# Altium PCB PCB1.PcbDoc
Units mm, origin at the board's own origin, x right, y up, seen from the top; angles counter-clockwise.
Board outline 49.91 x 49.91 mm, 4 copper layers (L1 (Sig), L2 (GND), L3 (GND), L4 (Sig)), stack 1.564 mm thick; 36 components, 59 nets, 255 pads, 135 vias.
Unrouted connection lines stored in the file: 54.
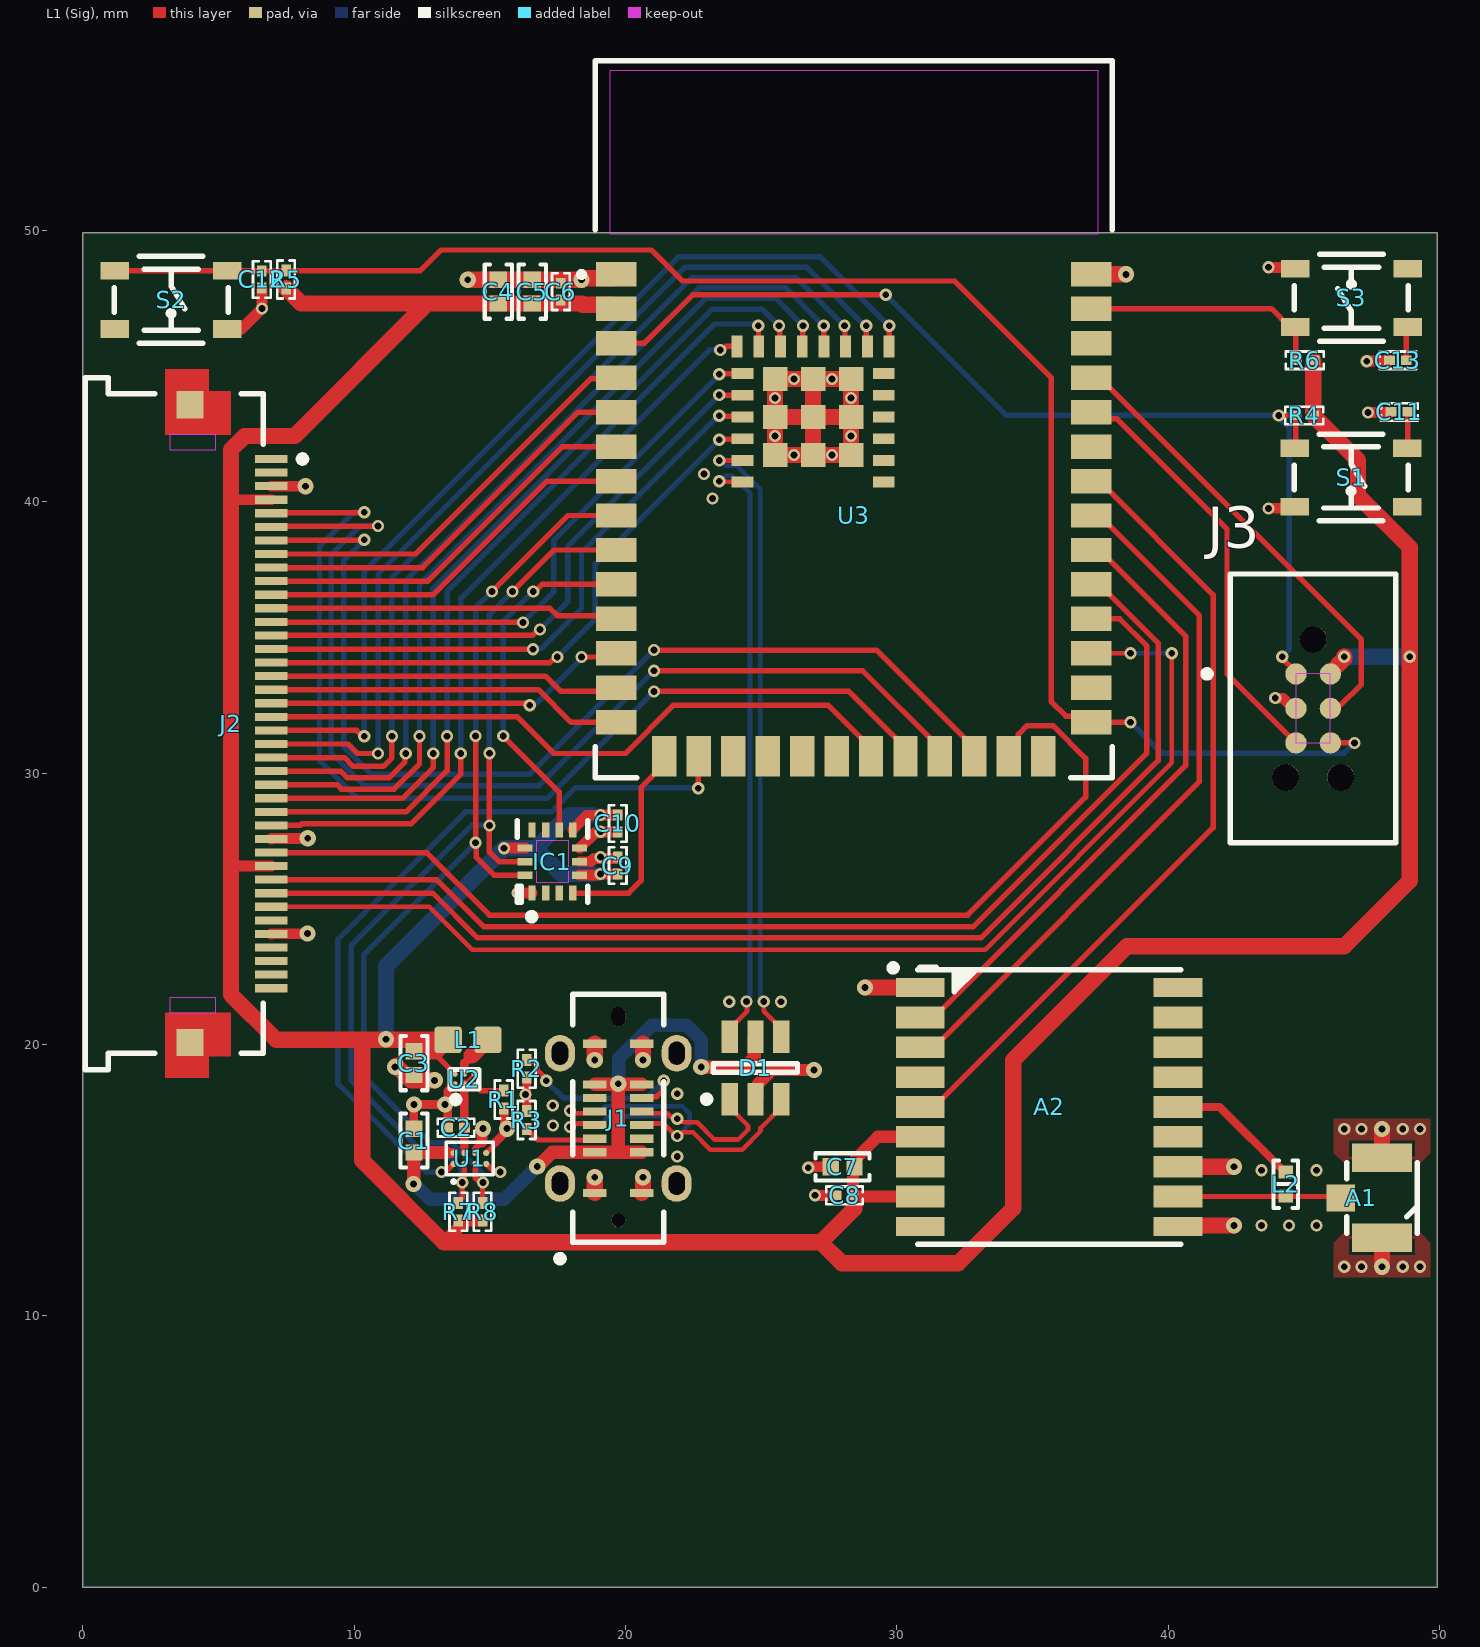
[diagram p0: L1 (Sig) view]
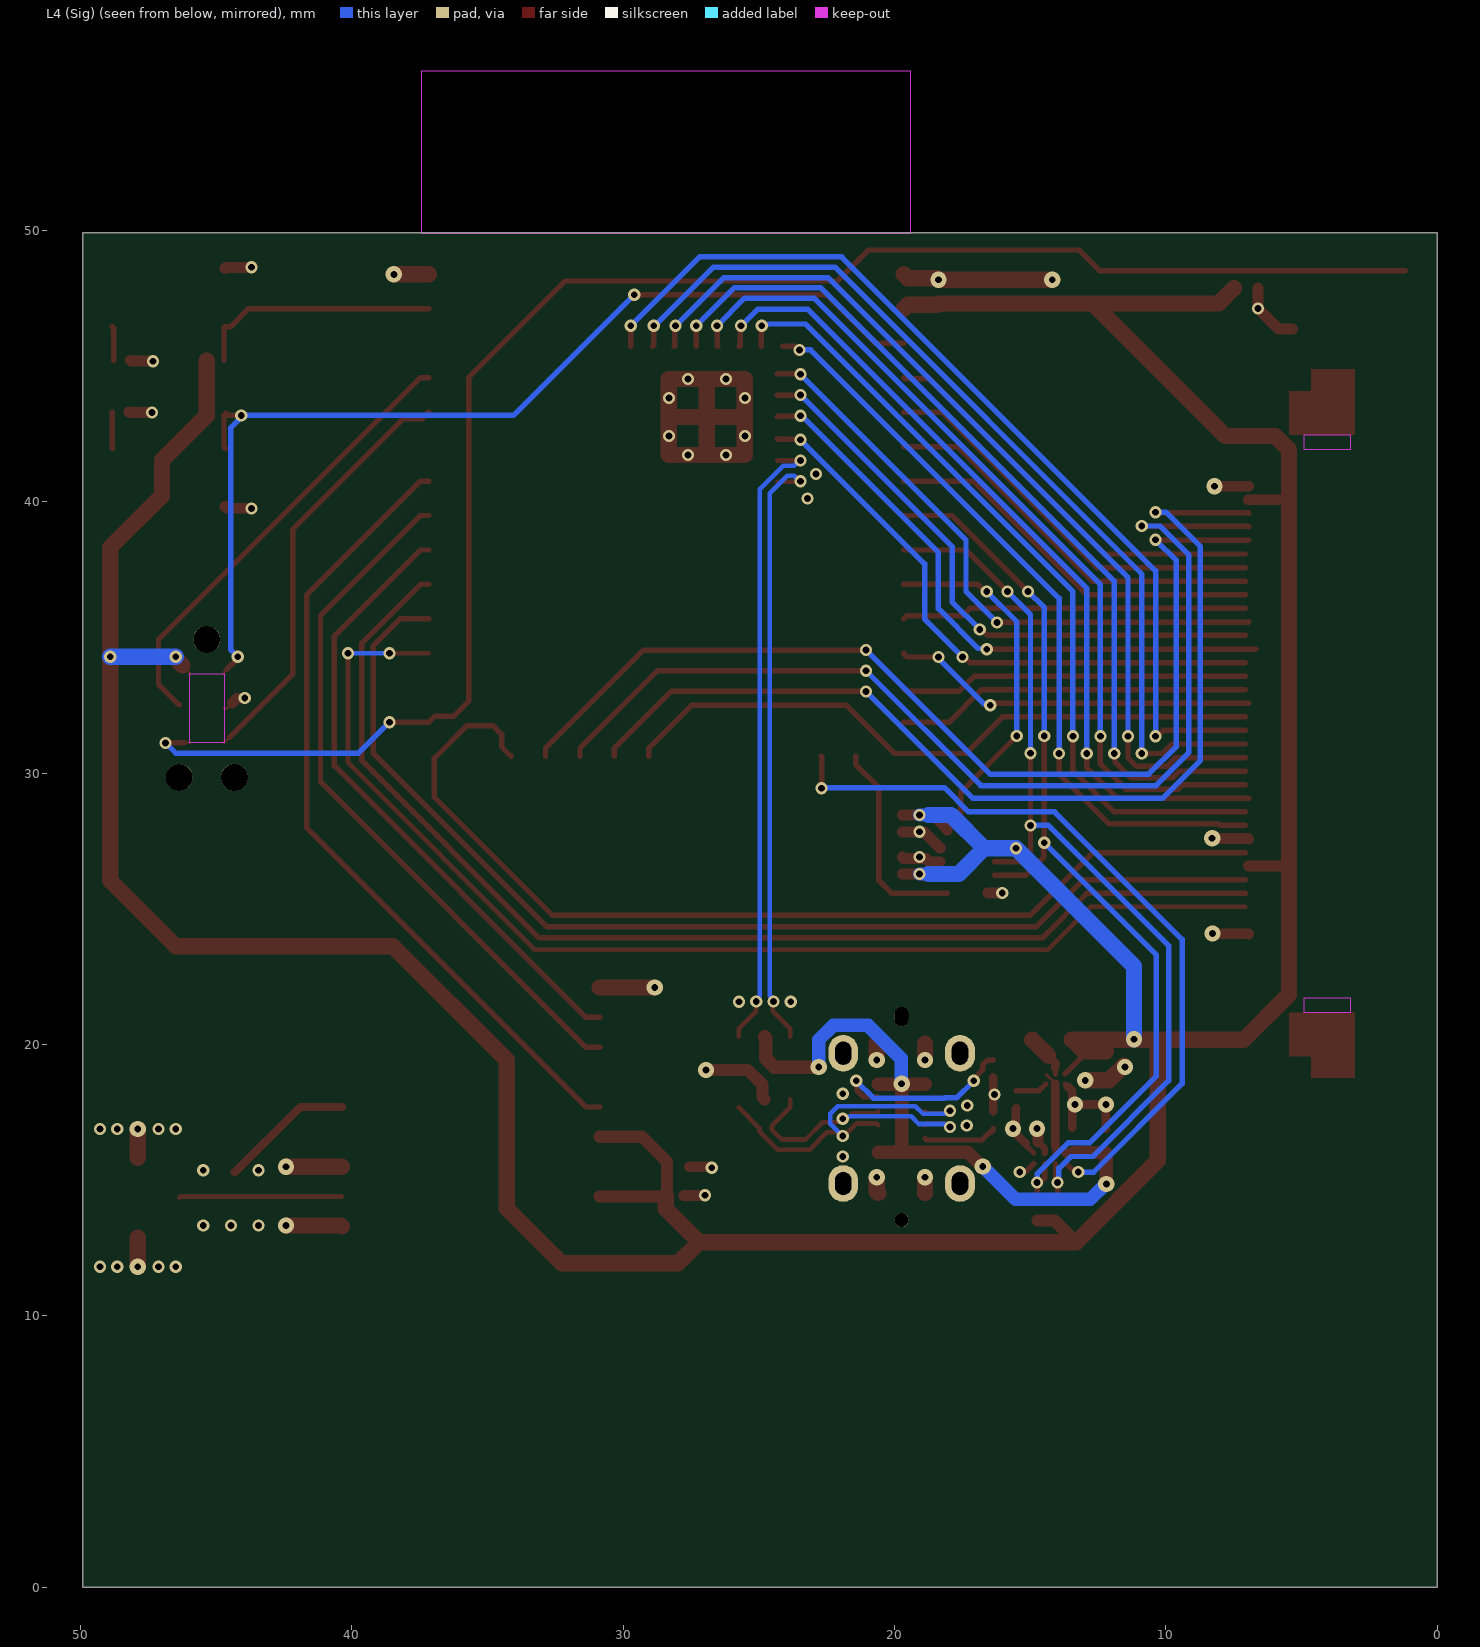
[diagram p1: L4 (Sig) view, seen from below]
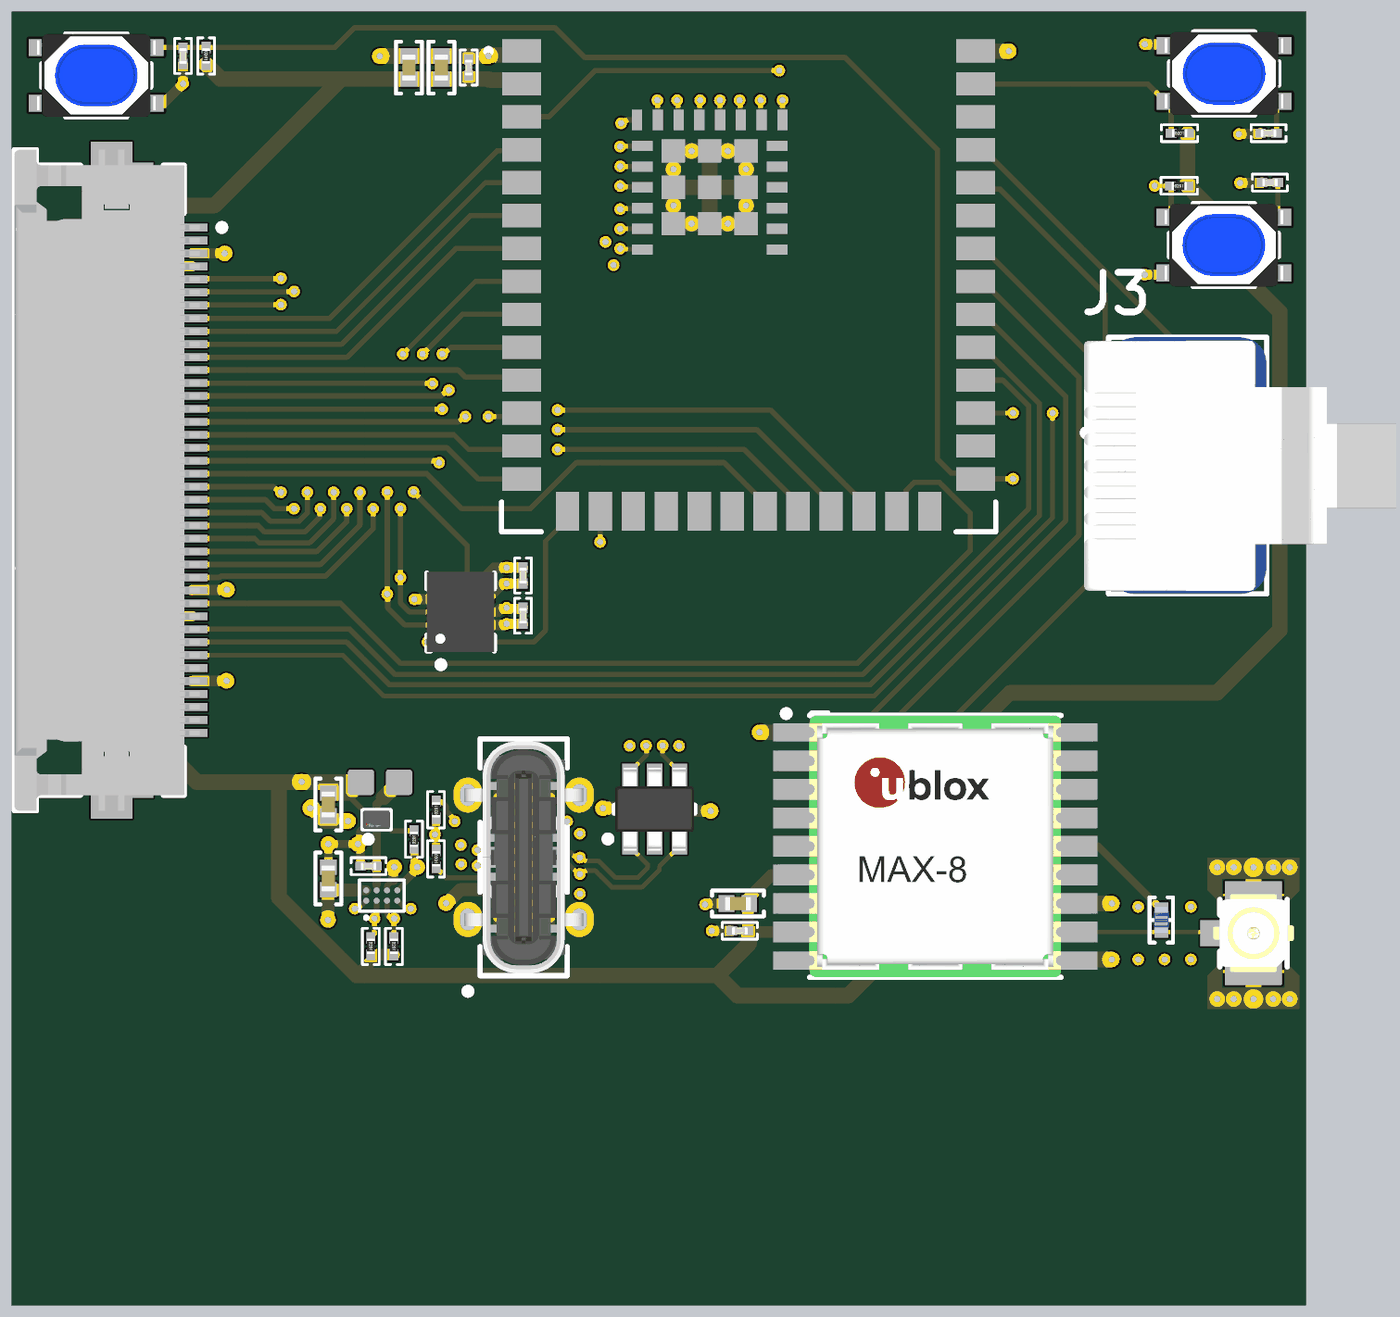
[diagram p2: 3D render of the assembled board from above, using the file's embedded part models]

## Layer stack, top to bottom
Top Solder: solder mask 0.0102, Solder Resist, Dk 3.8
L1 (Sig): signal copper 0.035
Dielectric 1: prepreg 0.0994, PP-015, Dk 4.1
L2 (GND): signal copper 0.0152
Core: core 1.265, Core-011, Dk 4.1
L3 (GND): signal copper 0.0152
Dielectric 2: prepreg 0.0994, PP-015, Dk 4.1
L4 (Sig): signal copper 0.035
Bottom Solder: solder mask 0.0102, Solder Resist, Dk 3.8

## Board outline
0,0 49.911,0 49.911,49.911 0,49.911

## Design rules (kind name [scope] priority, off if disabled: settings)
BoardOutlineClearance [All] p1: gap=0.2 ignorepadtopadclearanceinfootprint=FALSE
Clearance [All] p1: gap=0.102 ignorepadtopadclearanceinfootprint=FALSE except(0.127: Arc-Via Track-Via SMDPad-Via THPad-Via Via-Via Via-Fill Via-Poly Via-Region Via-Text; 0.25: Arc-Hole Track-Hole SMDPad-Hole THPad-Hole Via-Hole Fill-Hole Poly-Hole Region-Hole Text-Hole)
ComponentClearance [All] p1: gap=0.102 collisioncheckmode=3 verticalgap=0.102 showdistances=TRUE
DiffPairsRouting DiffPairsRouting_USB [InDifferentialPairClass('All Differential Pairs')] p1: maxlimit=0.2 minlimit=0.2 mostfreqgap=0.2 toplayer_minwidth=0.173 toplayer_maxwidth=0.173 toplayer_prefwidth=0.173 midlayer1_minwidth=0.137 midlayer1_maxwidth=0.137 midlayer1_prefwidth=0.137 midlayer2_minwidth=0.137 midlayer2_maxwidth=0.137 midlayer2_prefwidth=0.137 bottomlayer_minwidth=0.173 bottomlayer_maxwidth=0.173 bottomlayer_prefwidth=0.173 impedanceprofiledriven=TRUE impedanceprofileid={D67FAF45-6B27-4510-B377-CCE7B71501E8} impedanceprofilevalue=90.000000 maxuncoupledlength=12.7
Height [All] p1: minheight=0 maxheight=1816.048 prefheight=12.7
HoleSize [All] p1: absolutevalues=TRUE maxlimit=6.3 minlimit=0.2 maxpercent=80.000 minpercent=20.000
HoleToHoleClearance [All] p1: gap=0.25 allowstackedmicrovias=FALSE
MinimumAnnularRing [All] p1: minimumring=0.076
MinimumSolderMaskSliver [All] p1: minsoldermaskwidth=0
PlaneClearance [All] p1: clearance=0.102
PlaneConnect PlaneConnectPowerPads [InPadClass('PowerPads')] p1: planeconnectstyle=Direct reliefexpansion=0.508 reliefentries=4 reliefconductorwidth=0.254 reliefairgap=0.254
PlaneConnect [All] p2: pad.planeconnectstyle=Relief pad.reliefexpansion=0.3 pad.reliefentries=4 pad.reliefconductorwidth=0.102 pad.reliefairgap=0.102 via.planeconnectstyle=Direct via.reliefexpansion=0.3 via.reliefentries=4 via.reliefconductorwidth=0.127 via.reliefairgap=0.127
PolygonConnect PolygonConnectPowerPads [All vs (InPadClass('PowerPads'))] p1: connectstyle=Direct reliefconductorwidth=0.254 reliefentries=4 polygonreliefangle="90 Angle" airgapwidth=0.254
PolygonConnect [All] p2: thpad.connectstyle=Relief thpad.reliefconductorwidth=0.102 thpad.reliefentries=4 thpad.polygonreliefangle="90 Angle" thpad.airgapwidth=0.102 smdpad.connectstyle=Relief smdpad.reliefconductorwidth=0.102 smdpad.reliefentries=4 smdpad.polygonreliefangle="90 Angle" smdpad.airgapwidth=0.102 via.connectstyle=Direct via.reliefconductorwidth=0.127 via.reliefentries=4 via.polygonreliefangle="90 Angle" via.airgapwidth=0.127
RoutingVias [All] p1: holewidth=0.2 width=0.45 viastyle="Through Hole" minholewidth=0.2 minwidth=0.45 maxholewidth=6.3 maxwidth=6.55
SilkToSilkClearance [All] p1: silktosilkclearance=0
SilkToSolderMaskClearance [IsPad] p1: minsilkscreentomaskgap=0.102 clearancetoexposedcopper=TRUE
SolderMaskExpansion [All] p1: expansion=0.075 istentingtop=FALSE
SupplyNets "Schematic Supply Nets_2" [InNet('+3V3')] p1: voltage=0.000
SupplyNets "Schematic Supply Nets_1" [InNet('VUSB')] p2: voltage=0.000
SupplyNets "Schematic Supply Nets" [InNet('GND')] p3: voltage=0.000
UnRoutedNet [All] p1: checkbadconnections=TRUE
Width [All] p1: maxlimit=1816.048 minlimit=0.102 preferedwidth=0.102
Width Width_RF [InNetClass('RF')] p2: maxlimit=0.17 minlimit=0.139 preferedwidth=0.17 toplayer_minwidth=0.17 midlayer1_maxwidth=0.139 midlayer1_prefwidth=0.139 midlayer2_maxwidth=0.139 midlayer2_prefwidth=0.139 bottomlayer_minwidth=0.17 impedanceprofiledriven=TRUE impedanceprofileid={17CA45D9-92C9-4379-BA58-7E03AC1924B7} impedanceprofilevalue=50.000000 minimp=50.000000 maximp=50.000000 favimp=50.000000
19 further rules are at their usual default settings.

## Classes and differential pairs
net class RF: ANT_GNSS
differential pair USBD: +USBD_P -USBD_N
differential pair USB_D: +USB_D_P -USB_D_N

## Components (designator, comment, footprint, x,y, rotation, side; value= is the part's Value field where it differs from the comment)
A1 "1909763-1" "TE C-1909763" 47.879,14.351 r270 top
A2 "ATGM336H-5N" "U-BLOX MAX-8Q" 35.611,17.698 r0 top
C1 "10 µF" "CAP 0402_1005" 12.206,16.461 r270 top
C2 "1 µF" "CAP 0201_0603" 13.757,16.937 r0 top
C3 "10 µF" "CAP 0402_1005" 12.206,19.314 r90 top
C4 "10 µF" "CAP 0402_1005" 15.314,47.742 r270 top
C5 "10 µF" "CAP 0402_1005" 16.565,47.742 r270 top
C6 "0.1 µF" "CAP 0201_0603" 17.617,47.742 r270 top
C7 "10 µF" "CAP 0402_1005" 27.999,15.494 r0 top
C8 "0.1 µF" "CAP 0201_0603" 28.073,14.442 r0 top
C9 "0.1 µF" "CAP 0201_0603" 19.714,26.595 r270 top
C10 "0.1 µF" "CAP 0201_0603" 19.714,28.146 r90 top
C11 "1 µF" "CAP 0201_0603" 48.514,43.307 r0 top
C12 "1 µF" "CAP 0201_0603" 6.604,48.189 r90 top
C13 "1 µF" "CAP 0201_0603" 48.458,45.212 r0 top
D1 "USBLC6-2SC6" STM-SOT23-6L_V 24.788,19.136 r90 top value=2.5pF
IC1 "LSM6DSV16XTR" "STM LGA-14L 2.5x3.0MM" 17.305,26.741 r90 top
J1 "217182-0001" FP-217182-0001-MFG 19.736,17.279 r90 top
J2 "54104-4031" MOLX-54104-4031 5.449,31.824 r270 top
J3 "TC2030-MCP-NL" FP-TC2030-MCP-NL-MFG 45.339,32.385 r270 top
L1 "0.47uH" INDC1608X95N 14.198,20.174 r180 top
L2 "47 nH" "IND 0402_1005 RF WW" 44.323,14.859 r270 top
R1 "249 kOhms" "RES 0201_0603" 15.508,17.973 r90 top
R2 "5.1 kOhms" "RES 0201_0603" 16.36,19.111 r90 top
R3 "5.1 kOhms" "RES 0201_0603" 16.36,17.218 r270 top
R4 "5.1 kOhms" "RES 0201_0603" 45.014,43.18 r0 top
R5 "5.1 kOhms" "RES 0201_0603" 7.493,48.189 r270 top
R6 "5.1 kOhms" "RES 0201_0603" 45.029,45.212 r0 top
R7 "5.1 kOhms" "RES 0201_0603" 13.843,13.843 r270 top
R8 "5.1 kOhms" "RES 0201_0603" 14.732,13.843 r270 top
S1 "PTS810 SJM 250 SMTR LFS" "C&K PTS810" 46.736,40.894 r180 top
S2 "PTS810 SJM 250 SMTR LFS" "C&K PTS810" 3.259,47.439 r180 top
S3 "PTS810 SJM 250 SMTR LFS" "C&K PTS810" 46.748,47.516 r0 top
U1 "BQ25180YBGR" BGA8C40P2X4_104X159X50M 14.267,15.803 r90 top
U2 "TPS62802YKAR" FP-YKA0006-IPC_B 14.067,18.727 r90 top
U3 "ESP32-S31-WROOM-1" ESP32-S31-WROOM-1 28.412,40.122 r0 top locked

## Footprints (in the part's own frame and the unit in brackets; to place one, negate y for a bottom-side part, rotate by r counter-clockwise, add the part's x,y. Pads: shape width x height; smd on the part's side, far side on the other; paste and mask are expansions set on the pad)
BGA8C40P2X4_104X159X50M [mm] "BGA, 8-Leads, Body 1,04x1,59mmx0,50mm, Pitch 0,40mm"
  round 0.23 smd mask+0: A1(-0.2,0.6) A2(0.2,0.6) B1(-0.2,0.2) B2(0.2,0.2) C1(-0.2,-0.2) C2(0.2,-0.2) D1(-0.2,-0.6) D2(0.2,-0.6)
  silkscreen extent -0.92,-0.87 0.59,0.87, body extent -0.53,-0.8 0.53,0.81, height 0.5
"C&K PTS810" [mm] "T-Switch, 4-leads, body 4.2x3.2mm, C&K PTS810 SJM 250 SMTR LFS"
  rect 1.05x0.65 smd mask+0.1: 1(-2.075,1.075) 2(2.075,1.075) 3(-2.075,-1.075) 4(2.075,-1.075)
  silkscreen extent -2.1,-1.6 2.1,1.6, body extent -2.29,-1.6 2.29,1.6, height 2.7
"CAP 0201_0603" [mm] "Chip Capacitor, 2-Leads, Body 0.60x0.30mm, IPC Medium Density"
  rect 0.4x0.35 smd: 1(-0.31,0) 2(0.31,0)
  silkscreen extent -0.67,-0.33 0.67,0.33, body extent -0.3,-0.15 0.3,0.15, height 0.3
"CAP 0402_1005" [mm] "Chip Capacitor, 2-Leads, Body 1.02x0.51mm, IPC Medium Density"
  rect 0.6x0.64 smd: 1(-0.44,0) 2(0.44,0)
  silkscreen extent -1,-0.5 1,0.5, body extent -0.5,-0.26 0.5,0.26, height 0.52
ESP32-S31-WROOM-1 [mm]
  rect 1.5x0.9 smd mask+0: 1(-8.75,8.26) 2(-8.75,6.99) 3(-8.75,5.72) 4(-8.75,4.45) 5(-8.75,3.18) 6(-8.75,1.91) 7(-8.75,0.64) 8(-8.75,-0.63) 9(-8.75,-1.9) 10(-8.75,-3.17) 11(-8.75,-4.44) 12(-8.75,-5.71) 13(-8.75,-6.98) 14(-8.75,-8.25) 27(8.75,-8.25) 28(8.75,-6.98) 29(8.75,-5.71) 30(8.75,-4.44) 31(8.75,-3.17) 32(8.75,-1.9) 33(8.75,-0.63) 34(8.75,0.64) 35(8.75,1.91) 36(8.75,3.18) 37(8.75,4.45) 38(8.75,5.72) 39(8.75,6.99) 40(8.75,8.26)
  rect 0.9x1.5 smd mask+0: 15(-6.985,-9.5) 16(-5.715,-9.5) 17(-4.445,-9.5) 18(-3.175,-9.5) 19(-1.905,-9.5) 20(-0.635,-9.5) 21(0.635,-9.5) 22(1.905,-9.5) 23(3.175,-9.5) 24(4.445,-9.5) 25(5.715,-9.5) 26(6.985,-9.5)
  rect 0.9x0.9 smd mask+0: 41(-2.9,1.6) 41(-2.9,3) 41(-2.9,4.4) 41(-1.5,1.6) 41(-1.5,3) 41(-1.5,4.4) 41(-0.1,1.6) 41(-0.1,3) 41(-0.1,4.4)
  rect 0.4x0.8 smd mask+0: 42(1.3,5.6) 43(0.5,5.6) 44(-0.3,5.6) 45(-1.1,5.6) 46(-1.9,5.6) 47(-2.7,5.6) 48(-3.5,5.6) 49(-4.3,5.6)
  rect 0.8x0.4 smd mask+0: 50(-4.1,4.6) 51(-4.1,3.8) 52(-4.1,3) 53(-4.1,2.2) 54(-4.1,1.4) 55(-4.1,0.6) 56(1.1,0.6) 57(1.1,1.4) 58(1.1,2.2) 59(1.1,3) 60(1.1,3.8) 61(1.1,4.6)
  L1 (Sig) keep-out region: -9,9.75 9,9.75 9,15.75 -9,15.75
  L4 (Sig) keep-out region: -9,9.75 9,9.75 9,15.75 -9,15.75
  silkscreen extent -10.13,-10.29 9.53,16.13
FP-217182-0001-MFG [mm]
  rect 0.3x0.87 smd paste+0 mask+0: A1(-2.75,0.865) A4(-1.25,0.865) A5(-0.75,0.865) A6(-0.25,0.865) A7(0.25,0.865) A8(0.75,0.865) A9(1.25,0.865) A12(2.75,0.865) B1(2.75,-0.865) B4(1.25,-0.865) B5(0.75,-0.865) B6(0.25,-0.865) B7(-0.25,-0.865) B8(-0.75,-0.865) B9(-1.25,-0.865) B12(-2.75,-0.865)
  rrect100% 1.35x1.1 hole 0.6 slot 0.85 at 0 deg paste-2539.97 mask+0: S1(-2.4,2.15) S2(2.4,2.15) S3(-2.4,-2.15) S4(2.4,-2.15)
  round 0.52 hole 0.52 unplated paste-2539.97 mask+0: ""(-3.75,0)
  rrect100% 0.72x0.52 hole 0.52 slot 0.72 at 0 deg unplated paste-2539.97 mask+0: ""(3.75,0)
  silkscreen extent -5.29,-1.68 4.57,2.27, body extent -4.67,-2.8 4.67,2.8, height 0.25
FP-TC2030-MCP-NL-MFG [mil]
  round 30.98 smd paste-39370.1 mask+0: 1(-50,-25) 2(-50,25) 3(0,-25) 4(0,25) 5(50,-25) 6(50,25)
  round 39.02 hole 39.02 unplated paste-99999 mask+0: ""(-100,0) ""(100,40) ""(100,-40)
  Keep-Out Layer region: -49.99,-25 50.01,-25 50.01,25 -49.99,25
  silkscreen extent -195,-159 195,120, body extent -199,-124 199,124, height 10
FP-YKA0006-IPC_B [mm]
  round 0.183 smd paste+0 mask+0: A1(-0.175,0.35) A2(0.175,0.35) B1(-0.175,0) B2(0.175,0) C1(-0.175,-0.35) C2(0.175,-0.35)
  silkscreen extent -0.88,-0.53 0.35,0.53, body extent -0.6,-0.78 0.6,0.78, height 0.25
"IND 0402_1005 RF WW" [mm] "Chip Inductor, 2-Leads, Body 1.00x0.50mm, IPC High Density"
  rect 0.48x0.54 smd: 1(-0.44,0) 2(0.44,0)
  silkscreen extent -0.88,-0.45 0.87,0.45, body extent -0.5,-0.29 0.5,0.29, height 0.51
INDC1608X95N [mm] "Chip Inductor, 2-Leads, Body 1,60x0,80mm, IPC Medium Density"
  rrect25% 1.01x0.98 smd: 1(-0.735,0) 2(0.735,0)
  body extent -0.87,-0.48 0.88,0.47, height 0.95
MOLX-54104-4031 [mm] "FPC Connector, 40-Leads, Right Angle, Pitch 0.5 mm, Mated Height 2.0 mm, SMT"
  rect 0.3x1.2 smd: 1(-9.75,1.5) 2(-9.25,1.5) 3(-8.75,1.5) 4(-8.25,1.5) 5(-7.75,1.5) 6(-7.25,1.5) 7(-6.75,1.5) 8(-6.25,1.5) 9(-5.75,1.5) 10(-5.25,1.5) 11(-4.75,1.5) 12(-4.25,1.5) 13(-3.75,1.5) 14(-3.25,1.5) 15(-2.75,1.5) 16(-2.25,1.5) 17(-1.75,1.5) 18(-1.25,1.5) 19(-0.75,1.5) 20(-0.25,1.5) 21(0.25,1.5) 22(0.75,1.5) 23(1.25,1.5) 24(1.75,1.5) 25(2.25,1.5) 26(2.75,1.5) 27(3.25,1.5) 28(3.75,1.5) 29(4.25,1.5) 30(4.75,1.5) 31(5.25,1.5) 32(5.75,1.5) 33(6.25,1.5) 34(6.75,1.5) 35(7.25,1.5) 36(7.75,1.5) 37(8.25,1.5) 38(8.75,1.5) 39(9.25,1.5) 40(9.75,1.5)
  rect 1x1 smd: MP1(-11.75,-1.5) MP2(11.75,-1.5)
  L1 (Sig) region: -10.65,0 -12.25,0 -12.25,-0.8 -13.05,-0.8 -13.05,-2.4 -10.65,-2.4
  L1 (Sig) region: 10.65,0 12.25,0 12.25,-0.8 13.05,-0.8 13.05,-2.4 10.65,-2.4
  Keep-Out Layer region: 10.65,-0.55 10.1,-0.55 10.1,-2.25 10.65,-2.25
  Keep-Out Layer region: -10.1,-0.55 -10.65,-0.55 -10.65,-2.25 -10.1,-2.25
  silkscreen extent -12.75,-5.35 12.75,2.78, body extent -12.75,-5.35 12.75,1.8, height 2.06
"RES 0201_0603" [mm] "Chip Resistor, 2-Leads, Body 0.60x0.30mm, IPC Medium Density"
  rect 0.44x0.35 smd: 1(-0.325,0) 2(0.325,0)
  silkscreen extent -0.7,-0.32 0.7,0.32, body extent -0.3,-0.15 0.3,0.15, height 0.21
"STM LGA-14L 2.5x3.0MM" [mm] "LGA, 14-Leads, Body 3.00x2.50mm, Pitch 0.50mm"
  rect 0.55x0.275 smd: 1(-1.162,0.75) 2(-1.162,0.25) 3(-1.162,-0.25) 4(-1.162,-0.75) 8(1.162,-0.75) 9(1.162,-0.25) 10(1.162,0.25) 11(1.162,0.75)
  rect 0.275x0.55 smd: 5(-0.5,-1) 6(0,-1) 7(0.5,-1) 12(0.5,1) 13(0,1) 14(-0.5,1)
  L1 (Sig) keep-out region: -0.762,-0.6 0.762,-0.6 0.762,0.6 -0.762,0.6
  silkscreen extent -2.16,-1.3 1.5,1.3, body extent -1.55,-1.3 1.55,1.3, height 0.86
STM-SOT23-6L_V [mm] "SOT23, 6-Leads, Body 3.05x1.75mm, Pitch 0.95mm"
  rect 1.2x0.6 smd: 1(-1.15,0.95) 2(-1.15,0) 3(-1.15,-0.95) 4(1.15,-0.95) 5(1.15,0) 6(1.15,0.95)
  silkscreen extent -1.27,-1.55 0.15,1.92, body extent -1.6,-1.53 1.6,1.53, height 1.45
"TE C-1909763" [mm]
  rect 1.05x2.2 smd: G(-1.475,0) G(1.475,0)
  rect 1x1.05 smd: S(0,-1.525)
  silkscreen extent -1.3,-1.3 1.3,1.3, body extent -1.5,-1.55 1.5,1.55, height 1.23
"U-BLOX MAX-8Q" [mm] "MAX-8 / MAX-M8, 18-SMD Module, Body 10.7x9.8mm"
  rect 1.8x0.7 smd paste-10 mask+0: 1(-4.75,4.4) 9(-4.75,-4.4) 10(4.75,-4.4) 18(4.75,4.4)
  rect 1.8x0.8 smd paste-10 mask+0: 2(-4.75,3.3) 3(-4.75,2.2) 4(-4.75,1.1) 5(-4.75,0) 6(-4.75,-1.1) 7(-4.75,-2.2) 8(-4.75,-3.3) 11(4.75,-3.3) 12(4.75,-2.2) 13(4.75,-1.1) 14(4.75,0) 15(4.75,1.1) 16(4.75,2.2) 17(4.75,3.3)
  silkscreen extent -5.87,-5.05 4.85,5.25, body extent -4.85,-5.05 4.85,5.05, height 2.7

## Part data
A1: "CONN UMCC JACK STR 50OHM SMD", Frequency - Max="6 GHz", Housing Color=Ivory, Manufacturer="TE Connectivity AMP Connectors", Supplier Part Number 1=A118077CT-ND, ComponentLink1Description=Datasheet, ComponentLink1URL=https://www.te.com/commerce/DocumentDelivery/DDEController?Action=srchrtrv&DocNm=1909763&DocType=Customer+Drawing&DocLang=English, ComponentLink2Description="DigiKey Link", ComponentLink2URL=https://www.digikey.com/en/products/detail/te-connectivity-amp-connectors/1909763-1/4731728, Connector Style="U.FL (UMCC)", Connector Type="Jack, Male Pin", Contact Termination=Solder, Fastening Type=Snap-On, id=12, Impedance=50Ohm, LastUpdated=2022-06-29T18:17:07.053, Lifecycle Status=Active, Minimum Order=1, Mounting Type="Surface Mount", Number Of Ports=1, Packaging=TapeAndReel, Part Number=1909763-1, Part Status=Active, Price=0.23, Series=-, Shield Termination=Solder, Supplier 1=DigiKey
A2: "RF RX GLONASS/GNSS/GPS 1.575GHZ", Voltage - Supply="2.7V ~ 3.6V", ComponentLink1Description=Datasheet, ComponentLink1URL=https://github.com/YahboomTechnology/GPS_Module/blob/main/1.GPS%20module%20information/ATGM336H-5N%20Datasheet_EN.pdf, Data Interface="I²C, UART", id=1, Part Number=ATGM336H-5N, Series=ATGM336H-5N
C1 C3 C4 C5 C7: library part CL05A106MP5NUNC, "CAP CER 10UF 10V X5R 0402", Device Package="0402 (1005 Metric)", Manufacturer="Samsung Electro-Mechanics", Operating Temperature="-55°C ~ 85°C", Supplier Part Number 1=1276-1450-1-ND, Temperature Coefficient=X5R, Tolerance=±20%, Voltage - Rated=10V, Applications="General Purpose", Capacitance="10 µF", ComponentLink1Description=Datasheet, ComponentLink1URL=http://www.samsungsem.com/kr/support/product-search/mlcc/CL05A106MP5NUNC.jsp, ComponentLink2Description="DigiKey Link", ComponentLink2URL=https://www.digikey.com/en/products/detail/samsung-electro-mechanics/CL05A106MP5NUNC/3887108, id=35, LastUpdated=2023-01-03T20:04:20.307, Lifecycle Status=Active, Minimum Order=1, Mounting Type="Surface Mount, MLCC", Package / Case="0402 (1005 Metric)", Packaging=TapeAndReel, Part Number=CL05A106MP5NUNC, Part Status=Active, PartId=1762, Price=0.02, Series=CL, Size / Dimension="0.039\" L x 0.020\" W (1.00mm x 0.50mm)", Supplier 1=DigiKey, Thickness (Max)="0.028\" (0.70mm)"
C2 C11 C12 C13: library part CL03A105MP3NSNC, "CAP CER 1UF 10V X5R 0201", Device Package="0201 (0603 Metric)", Manufacturer="Samsung Electro-Mechanics", Operating Temperature="-55°C ~ 85°C", Supplier Part Number 1=1276-1324-1-ND, Temperature Coefficient=X5R, Tolerance=±20%, Voltage - Rated=10V, Applications="General Purpose", Capacitance="1 µF", ComponentLink1Description=Datasheet, ComponentLink1URL=http://www.samsungsem.com/kr/support/product-search/mlcc/CL03A105MP3NSNC.jsp, ComponentLink2Description="DigiKey Link", ComponentLink2URL=https://www.digikey.com/en/products/detail/samsung-electro-mechanics/CL03A105MP3NSNC/3886982, id=1118, LastUpdated=2023-01-03T20:01:05.547, Lifecycle Status=Active, Minimum Order=1, Mounting Type="Surface Mount, MLCC", Package / Case="0201 (0603 Metric)", Packaging=TapeAndReel, Part Number=CL03A105MP3NSNC, Part Status=Active, PartId=1341, Price=0.05, Series=CL, Size / Dimension="0.024\" L x 0.012\" W (0.60mm x 0.30mm)", Supplier 1=DigiKey, Thickness (Max)="0.013\" (0.33mm)"
C6 C8 C9 C10: library part CL03A104KO3NNNC, "CAP CER 0.1UF 16V X5R 0201", Device Package="0201 (0603 Metric)", Manufacturer="Samsung Electro-Mechanics", Operating Temperature="-55°C ~ 85°C", Supplier Part Number 1=1276-1319-1-ND, Temperature Coefficient=X5R, Tolerance=±10%, Voltage - Rated=16V, Applications="General Purpose", Capacitance="0.1 µF", ComponentLink1Description=Datasheet, ComponentLink1URL=http://www.samsungsem.com/kr/support/product-search/mlcc/CL03A104KO3NNNC.jsp, ComponentLink2Description="DigiKey Link", ComponentLink2URL=https://www.digikey.com/en/products/detail/samsung-electro-mechanics/CL03A104KO3NNNC/3886977, id=937, LastUpdated=2023-01-03T20:01:08.207, Lifecycle Status=Active, Minimum Order=1, Mounting Type="Surface Mount, MLCC", Package / Case="0201 (0603 Metric)", Packaging=TapeAndReel, Part Number=CL03A104KO3NNNC, Part Status=Active, PartId=1101, Price=0.01, Series=CL, Size / Dimension="0.024\" L x 0.012\" W (0.60mm x 0.30mm)", Supplier 1=DigiKey, Thickness (Max)="0.013\" (0.33mm)"
D1: "STMicroelectronics Uni-directional TVS Diode Array, Vc=17V, SMD, SOT-23, Vbr(min)=6V", Breakdown Voltage=6V, Case/Package=SOT-23, Clamping Voltage=17V, Forward Voltage=1.1V, Leakage Current=150nA, Manufacturer=STMicroelectronics, Max Junction Temperature (Tj)=125°C, Max Repetitive Reverse Voltage (Vrrm)=5.25V, Min Operating Temperature=-40°C, Peak Pulse Current=5A, Peak Pulse Power=85W, Power Line Protection=Yes, Reverse Standoff Voltage=5V, Test Current=1mA, Category="TVS Diodes", China RoHS=Compliant, ComponentLink1Description=https://datasheet.octopart.com:443/USBLC6-2SC6-STMicroelectronics-datasheet-10412581.pdf?src-supplier=Newark, ComponentLink1URL=https://datasheet.octopart.com:443/USBLC6-2SC6-STMicroelectronics-datasheet-10412581.pdf?src-supplier=Newark, ComponentLink2Description=https://datasheet.octopart.com:443/USBLC6-2SC6-STMicroelectronics-datasheet-181961833.pdf?src-supplier=Newark, ComponentLink2URL=https://datasheet.octopart.com:443/USBLC6-2SC6-STMicroelectronics-datasheet-181961833.pdf?src-supplier=Newark, ComponentLink3Description=https://datasheet.octopart.com:443/USBLC6-2SC6-STMicroelectronics-datasheet-525477.pdf?src-supplier=Factory+Futures, ComponentLink3URL=https://datasheet.octopart.com:443/USBLC6-2SC6-STMicroelectronics-datasheet-525477.pdf?src-supplier=Factory+Futures, ComponentLink4Description=https://datasheet.octopart.com:443/USBLC6-2SC6-STMicroelectronics-datasheet-82998616.pdf?src-supplier=Farnell, ComponentLink4URL=https://datasheet.octopart.com:443/USBLC6-2SC6-STMicroelectronics-datasheet-82998616.pdf?src-supplier=Farnell, ComponentLink5Description=https://datasheet.octopart.com:443/USBLC6-2SC6-STMicroelectronics-datasheet-46285.pdf?src-supplier=Farnell, ComponentLink5URL=https://datasheet.octopart.com:443/USBLC6-2SC6-STMicroelectronics-datasheet-46285.pdf?src-supplier=Farnell, ComponentLink6Description=https://datasheet.octopart.com:443/USBLC6-2SC6-STMicroelectronics-datasheet-14050643.pdf?src-supplier=iiiC, ComponentLink6URL=https://datasheet.octopart.com:443/USBLC6-2SC6-STMicroelectronics-datasheet-14050643.pdf?src-supplier=iiiC, ComponentLink7Description=https://datasheet.octopart.com:443/USBLC6-2SC6-STMicroelectronics-datasheet-10521292.pdf?src-supplier=Jameco+(USA), ComponentLink7URL=https://datasheet.octopart.com:443/USBLC6-2SC6-STMicroelectronics-datasheet-10521292.pdf?src-supplier=Jameco+(USA), Contact Plating=Tin, Country of Origin="Mainland China", Data Rate=480Mbps, Depth=1.75mm, Direction=Unidirectional, Element Configuration=Dual, ESD Protection=Yes, Export Control Classification Number (ECCN) Code=EAR99, Harmonized Tariff Schedule (HTS) Code=8541.10.00.50, Height=1.45mm, Introduction Date=2005-03-15, Lead Free="Lead Free", Length=3.05mm, Lifecycle Status=Production, Manufacturer Part Number=USBLC6-2SC6, Max Breakdown Voltage=6V, Max Operating Temperature=125°C, Max Reverse Leakage Current=150nA, Min Breakdown Voltage=6V, Mounting Technology="Surface Mount", Number of Bidirectional Channels=2, Number of Channels=2, Number of Elements=1, Number of Terminals=6, Operating Supply Voltage=1.1V, Peak Reverse Current=150nA, Pins=6, Polarity=Unidirectional, Pricing="3000=0,0806, 6000=0,0793, 12000=0,078, 15000=0,0776, 45000=0,075 (USD)", Radiation Hardening=No, REACH SVHC=Unaffected, Reverse Breakdown Voltage=6V, RoHS=Compliant, Schedule B="8536300000, 8536300000|8536300000|8536300000|8536300000|8536300000|8536300000|8536300000|8536300000|8536300000|8536300000|8536300000|8536300000|8536300000|8536300000|8536300000|8536300000|8536300000|8536300000|8536300000|8536300000|8536300000|8536300000|8536300000|85", Stock=135000, Supplier="Future Electronics", Supplier Part Number=USBLC6-2SC6, Termination=SMD/SMT, Width=1.75mm, Working Voltage=5V
IC1: library part "STM LSM6DSV16X", "INEMO 3D ACCELEROMETER AND 3D GY", Manufacturer=STMicroelectronics, Operating Temperature="-40°C ~ 85°C", Supplier Device Package="14-LGA (2.5x3)", Supplier Part Number 1=497-LSM6DSV16XTRCT-ND, ComponentLink1Description=Datasheet, ComponentLink1URL=https://www.st.com/content/ccc/resource/technical/document/datasheet/group3/47/03/b2/44/47/32/4b/76/DM00741844/files/DM00741844.pdf/jcr:content/translations/en.DM00741844.pdf, ComponentLink2Description="DigiKey Link", ComponentLink2URL=https://www.digikey.com/en/products/detail/stmicroelectronics/LSM6DSV16XTR/16841485, id=1, LastUpdated=2026-02-04T10:16:47.433, Lifecycle Status=Active, Minimum Order=1, Mounting Type="Surface Mount", Output Type="I2C, SPI", Packaging=TapeAndReel, Part Number=LSM6DSV16XTR, Price=2.76, Sensor Type="Accelerometer, Gyroscope, Temperature, 6 Axis", Series=-, Supplier 1=DigiKey
J1: "USB Connector, Receptacle, USB 2.0, USB Type C, 16 Ways, Gold, SMT, Straight, Copper Alloy", Package=Package, Check_prices=https://www.snapeda.com/parts/TYPE-C-31-M-12/HRO+Electronics+Co.%252C+Ltd./view-part/?ref=eda, MF="HRO Electronics Co., Ltd.", MP=TYPE-C-31-M-12, SnapEDA_Link=https://www.snapeda.com/parts/TYPE-C-31-M-12/HRO+Electronics+Co.%252C+Ltd./view-part/?ref=snap
J2: library part CMP-1241-00508-1, "0.5 mm Pitch Easy-On(TM) Type FPC Connector, 2.0 mm Mated Height, Right Angle, ZIF, SMT, Top Contact, 40 Circuits, -20 to 85 degC, ELV and RoHS Compliant, Tape and Reel", Current (Max per Contact)=0.5A, Manufacturer=Molex, Voltage (Max)=50V, Circuits (Loaded)=40, ComponentLink1Description="Manufacturer URL", ComponentLink1URL=http://www.molex.com/molex/index.jsp, ComponentLink2Description=Datasheet, ComponentLink2URL=http://www.molex.com/webdocs/datasheets/pdf/en-us/0541044031_FFC_FPC_CONNECTORS.pdf, ComponentLink3Description="Package Specification", ComponentLink3URL=http://www.molex.com/pdm_docs/sd/541044031_sd.pdf, Contact Position=Top, Durability (mating cycles max)=20, Entry Angle="90degrees Angle", Mated Height=2.00mm, Material - Metal="Phosphor Bronze", Mounting Technology="Surface Mount", Number of Rows=1, Orientation="Right Angle", PackageDescription="40-Lead FPC Connector, Pitch 0.5 mm", PackageReference=54104-4031, PackageVersion="Rev. F, 06/2012", Packing="Tape and Reel", PartNumber=54104-4031, PCB Locator=No, PCB Retention=Yes, Pitch - Mating Interface=0.50mm, Polarized to PCB=Yes, RoHS=TRUE, Stackable=No
J3: library part CMP-205963-000002-1, "CABLE TAG-CONNECT IN-CIRCUIT", Package Quantity=1, Lead Free="Lead Free", Reach SVHC Compliant=Yes, RoHS Compliant=Yes, Series=-
L1: library part LQM18PNR47MFHD, "Inductor Power Chip Shielded Multi-Layer 0.47uH 20% 1MHz Ferrite 1.4A 0.125Ohm DCR 0603 T/R"
L2: library part LQW15AN47NJ00D, "FIXED IND 47NH 210MA 1.08OHM SMD", Current Rating (Amps)="210 mA", DC Resistance (DCR)="1.08Ohm Max", Device Package="0402 (1005 Metric)", Frequency - Self Resonant=2.9GHz, Inductance Frequency - Test="100 MHz", Manufacturer="Murata Electronics", Operating Temperature="-55°C ~ 125°C", Q @ Freq="25 @ 200MHz", Supplier Part Number 1=490-1154-1-ND, Tolerance=±5%, ComponentLink1Description=Datasheet, ComponentLink1URL=https://search.murata.co.jp/Ceramy/image/img/P02/JELF243A-0050.pdf, ComponentLink2Description="DigiKey Link", ComponentLink2URL=https://www.digikey.com/en/products/detail/murata-electronics/LQW15AN47NJ00D/584363, Height - Seated (Max)="0.024\" (0.60mm)", id=266, Inductance="47 nH", LastUpdated=2023-01-02T20:59:31.513, Lifecycle Status=Active, Material - Core=Non-Magnetic, Minimum Order=1, Mounting Type="Surface Mount", Package / Case="0402 (1005 Metric)", Packaging=TapeAndReel, Part Number=LQW15AN47NJ00D, Part Status=Active, PartId=266, Price=0.05, Series=LQW15, Shielding=Unshielded, Size / Dimension="0.039\" L x 0.020\" W (1.00mm x 0.50mm)", Supplier 1=DigiKey, Type=Wirewound
R1: library part RC0201FR-07249KL, "RES 249K OHM 1% 1/20W 0201", Device Package="0201 (0603 Metric)", Manufacturer=Yageo, Operating Temperature="-55°C ~ 125°C", Power (Watts)="0.05W, 1/20W", Supplier Device Package=0201, Supplier Part Number 1=YAG2335CT-ND, Temperature Coefficient=±200ppm/°C, Tolerance=±1%, ComponentLink1Description=Datasheet, ComponentLink1URL=https://www.yageo.com/upload/media/product/productsearch/datasheet/rchip/PYu-RC_Group_51_RoHS_L_10.pdf, ComponentLink2Description="DigiKey Link", ComponentLink2URL=https://www.digikey.com/en/products/detail/yageo/RC0201FR-07249KL/3202395, Composition="Thick Film", Features="Moisture Resistant", Height - Seated (Max)="0.010\" (0.26mm)", id=1449, LastUpdated=2023-01-03T20:15:18.457, Lifecycle Status=Active, Minimum Order=1, Number Of Terminations=2, Package / Case="0201 (0603 Metric)", Packaging=CutTape, Part Number=RC0201FR-07249KL, Part Status=Active, PartId=1449, Price=0.01, Resistance="249 kOhms", Series=RC_L, Size / Dimension="0.024\" L x 0.012\" W (0.60mm x 0.30mm)", Supplier 1=DigiKey
R2 R3 R4 R5 R6 R7 R8: library part AC0201FR-075K1L, "RES SMD 5.1K OHM 1% 1/20W 0201", Device Package="0201 (0603 Metric)", Manufacturer=Yageo, Operating Temperature="-55°C ~ 155°C", Power (Watts)="0.05W, 1/20W", Ratings=AEC-Q200, Supplier Device Package=0201, Supplier Part Number 1=YAG5228CT-ND, Temperature Coefficient=±200ppm/°C, Tolerance=±1%, ComponentLink1Description=Datasheet, ComponentLink1URL=https://www.yageo.com/upload/media/product/productsearch/datasheet/rchip/PYu-AC_51_RoHS_L_7.pdf, ComponentLink2Description="DigiKey Link", ComponentLink2URL=https://www.digikey.com/en/products/detail/yageo/AC0201FR-075K1L/5894738, Composition="Thick Film", Features="Automotive AEC-Q200, Moisture Resistant", Height - Seated (Max)="0.010\" (0.26mm)", id=225, LastUpdated=2023-01-03T20:15:25.347, Lifecycle Status=Active, Minimum Order=1, Number Of Terminations=2, Package / Case="0201 (0603 Metric)", Packaging=TapeAndReel, Part Number=AC0201FR-075K1L, Part Status=Active, PartId=225, Price=0.01, Resistance="5.1 kOhms", Series=AC, Size / Dimension="0.024\" L x 0.012\" W (0.60mm x 0.30mm)", Supplier 1=DigiKey
S1 S2 S3: "SWITCH TACTILE SPST-NO 0.05A 16V", Contact Rating @ Voltage="0.05A @ 16VDC", Manufacturer=C&K, Operating Force=160gf, Operating Temperature="-40°C ~ 85°C", Supplier Part Number 1=CKN10502CT-ND, Actuator Height Off Pcb, Vertical=2.50mm, Actuator Orientation="Top Actuated", Actuator Type="Oval Button", Circuit=SPST-NO, ComponentLink1Description=Datasheet, ComponentLink1URL=https://dznh3ojzb2azq.cloudfront.net/products/Tactile/PTS810/documents/datasheet.pdf, ComponentLink2Description="DigiKey Link", ComponentLink2URL=http://digikey.com/product-detail/en/c-k/PTS810-SJM-250-SMTR-LFS/CKN10502CT-ND/4176673, id=32, Illumination=Non-Illuminated, LastUpdated=2020-04-09T10:00:13.177, Lifecycle Status=Active, Minimum Order=1, Mounting Type="Surface Mount", Outline="4.20mm x 3.20mm", Packaging=TapeAndReel, Part Number="PTS810 SJM 250 SMTR LFS", Part Status=Active, Price=0.16, Series=PTS810, Supplier 1=DigiKey, Switch Function=Off-Mom, Termination Style="J Lead"
U1: "1-A Li-ion and LiFePO4 I²C programmable linear charger with regulated power path"
U2: library part CMP-04918-000016-1, "IC REG BUCK ADJ/FIX 1A 6DSBGA", Manufacturer="Texas Instruments", Max Junction Temp=+125°C, Max Supply Voltage=5.5V, Min Supply Voltage=1.8V, Nominal Supply Current=8mA, Output Current=1A, Output Voltage=1.8-3.3V, Package=YKA0006, Switching Frequency=4MHz, Temperature="-40°C to +125°C", Temperature Range Low=-40°C, Automotive=No, Category=IC, ComponentLink2Description=Datasheet, ComponentLink2URL=http://www.ti.com/lit/ds/symlink/tps62802.pdf, Device Class L1="Integrated Circuits (ICs)", Device Class L2="Power Management ICs", Device Class L3="Voltage Regulators - Switching", Digikey Description="IC REG BUCK ADJ/FIX 1A 6DSBGA", Height=0.4mm, Ipc Land Pattern Name=BGA6N35P2X3_105X70X40, Lead Free=Yes, Manufacturer Part Number=TPS62802YKAR, Max Duty Cycle=100%, Mouser Description="1.8V-5.5V input, 1-A ultra-low Iq step-down converter 6-DSBGA -40 to 125", Number Of Outputs=1, Octopart=https://octopart.com/tps62802ykar-texas+instruments-93944571, Output Type=AdjustableProgrammable, RoHS=TRUE, Standoff Height=0.13mm, Switching Topology=Buck, Temperature Range High=+125°C

## Via types
v1: diameter 0.45, hole 0.25, L1 (Sig) to L4 (Sig), 108 vias
v2: diameter 0.6, hole 0.25, L1 (Sig) to L4 (Sig), 27 vias

## Nets (pads, with @x,y where several pads share a name; then routed paths per layer and width w, separated by ;. In a path a pad name is that pad's centre, name@x,y a point inside that pad or via, vN(x,y) a via of type N, cw(c..) or ccw(c..) an arc to the next point about the centre after c; other vN are vias at no path point)
+3V3: A2.6 A2.8 C3.2 C4.2 C5.2 C6.2 C7.2 C8.2 C9.2 C10.2 IC1.5 IC1.8 IC1.12 J2.4 J2.31 J3.2 L1.2 R4.2 R5.2 R6.2 R7.2 R8.2 U2.A2 U3.2 | length 163.8
  L1 (Sig) w0.102: J3.2 45.974,33.706 46.233,33.964
  L1 (Sig) w0.2: 13.08,19.554 U2.A2@13.717,18.917
  L1 (Sig) w0.4: 5.461,26.574 J2.31 ; 5.461,40.074 J2.4 ; v1(15.523,27.23) 15.529,27.236 16.299,27.236 IC1.12 ; IC1.8 18.055,27.916 18.586,28.447 19.07,28.447 v1(19.079,28.456) C10.2 ; IC1.5 19.022,26.241 19.066,26.285 v1(19.079,26.285) C9.2
  L1 (Sig) w0.45: 13.304,12.719 14.103,13.518 R8.2 ; C8.2 28.383,15.683 29.298,16.598 A2.6 ; C8.2@28.427,14.398 A2.8
  L1 (Sig) w0.6: R5.2 8.055,47.302 12.689,47.302 ; C3.2 13.028,19.754 L1.2@13.448,20.174 ; L1.2 10.297,20.174 ; U3.2 19.512,47.262 18.419,47.262 18.379,47.302 C4.2 12.689,47.302 ; C8.2@28.427,14.398 28.427,13.949 27.197,12.719 ; R6.2@45.339,45.197 R4.2 46.99,41.529 46.99,40.222 48.895,38.317 v1(48.895,34.29) 48.895,26.035 46.482,23.622 38.481,23.622 34.29,19.431 34.29,13.97 32.258,11.938 27.978,11.938 27.197,12.719 ; 46.233,33.964 46.482,34.214 v1(46.482,34.29) ; 10.297,20.174 10.297,15.726 13.304,12.719 27.197,12.719 ; 10.297,20.174 7.131,20.174 5.461,21.844 5.461,26.574 5.461,40.074 5.461,41.918 5.961,42.418 7.805,42.418 12.689,47.302
  L4 (Sig) w0.49: 18.744,26.285 v1(19.079,26.285) ; 18.744,28.456 v1(19.079,28.456)
  L4 (Sig) w0.6: v2(11.176,20.193) 11.176,22.883 v1(15.523,27.23) 16.688,27.23 ; 18.744,26.285 17.633,26.285 16.688,27.23 ; 18.744,28.456 17.914,28.456 16.688,27.23 ; v1(46.482,34.29) v1(48.895,34.29)
ANT_GNSS: A1.S A2.11 L2.2 | length 6
  L1 (Sig) w0.173: A2.11 46.307,14.398 A1.S
BAT: U1.C2 | length 1
  L1 (Sig) w0.232: U1.C2 14.467,16.169 14.708,16.41
  L1 (Sig) w0.4: 14.708,16.41 14.708,16.863 v2(14.746,16.901)
BQ_INT: U1.A1 U3.16 | length 27.9
  L1 (Sig) w0.2: v1(13.226,15.298) 13.274,15.346 13.402,15.346 13.659,15.603 U1.A1 ; v1(22.685,29.442) 22.685,30.61 U3.16
  L4 (Sig) w0.2: v1(13.226,15.298) 12.657,15.298 9.398,18.557 9.398,23.876 14.097,28.575 17.272,28.575 18.161,29.464 22.663,29.464 v1(22.685,29.442)
DBG_RX0: J3.5 U3.36 | length 15.7
  L1 (Sig) w0.102: J3.5@44.502,31.317 J3.5
  L1 (Sig) w0.2: U3.36 37.406,43.058 38.095,43.058 42.164,38.989 42.164,33.655 J3.5@44.502,31.317
DBG_TX0: J3.4 U3.37 | length 16.7
  L1 (Sig) w0.2: U3.37 37.462,44.572 47.117,34.917 47.117,33.274 46.355,32.512
EN: C11.2 J3.1 R4.1 S1.3 S1.4 U3.3 | length 40.3
  L1 (Sig) w0.102: J3.1@44.593,33.829 44.704,33.718 J3.1
  L1 (Sig) w0.2: U3.3 19.667,45.847 20.701,45.847 22.479,47.625 v1(29.591,47.625) ; v1(44.069,43.18) 44.569,43.18 44.629,43.24 44.629,43.255 44.704,43.18 44.704,42.012 S1.4 ; v1(44.196,34.29) 44.196,34.227 J3.1@44.593,33.829 ; S1.3 48.824,41.982 C11.2
  L4 (Sig) w0.2: v1(29.591,47.625) 34.036,43.18 v1(44.069,43.18) 44.069,43.112 44.45,42.731 44.45,34.544 v1(44.196,34.29)
GND: A1.G A2.1 A2.10 A2.12 C1.1 C2.1 C3.1 C4.1 C5.1 C6.1 C7.1 C8.1 C9.1 C10.1 C11.1 C12.1 C13.1 D1.2 IC1.1 IC1.6 IC1.7 J1.A1 J1.A12 J1.B1 J1.B12 J1.S1 J1.S2 J1.S3 J1.S4 J2.3 J2.29 J2.36 J2.MP1 J2.MP2 J3.3 R1.1 R2.1 R3.1 S1.1 S1.2 S2.1 S2.2 S3.1 S3.2 U1.D2 U2.A1 U3.1 U3.40 U3.41 | length 62
  L1 (Sig) w0.102: J3.3@44.402,32.582 44.599,32.385 J3.3
  L1 (Sig) w0.183: 13.608,18.444 U2.A1
  L1 (Sig) w0.197: U1.D2 15.167,16.303 15.167,16.355
  L1 (Sig) w0.314: C1.1 v2(12.206,17.79) v2(13.349,17.79) ; C2.1 13.447,18.282 13.608,18.444 ; 15.167,16.355 v2@15.635,16.824 ; R1.1 15.526,17.63 15.526,17.088 15.635,16.979 v2(15.635,16.901) ; R3.1 R2.1
  L1 (Sig) w0.358: IC1.6 18.679,26.741 18.698,26.722 18.703,26.722 18.724,26.743
  L1 (Sig) w0.397: J2.3 J2.3@7.35,40.574 ; J2.3@7.351,40.573 v2@8.207,40.573
  L1 (Sig) w0.4: S2.1 5.851,46.364 v1(6.604,47.117) C12.1 ; J2.36 6.956,24.081 8.274,24.081 v2(8.281,24.088) ; J2.29 6.962,27.587 8.282,27.587 v2(8.295,27.601) ; v1(16.031,25.579) IC1.1 ; IC1.7 18.318,27.241 18.913,27.836 C10.1 ; 18.724,26.743 18.841,26.86 19.669,26.86 C9.1 ; v1(26.732,15.458) 26.745,15.458 26.781,15.494 C7.1 ; v1(26.986,14.442) C8.1 ; v1(43.688,39.751) 43.698,39.761 44.603,39.761 S1.2 ; v1(43.688,48.641) 43.698,48.631 44.632,48.631 S3.1 ; v1(43.942,32.766) 43.952,32.756 44.228,32.756 J3.3@44.402,32.582 ; v1(47.315,45.175) 47.325,45.184 48.12,45.184 C13.1 ; v1(47.358,43.29) 48.187,43.29 C11.1
  L1 (Sig) w0.45: D1.2 24.863,18.061 24.863,18.524 25.404,19.065 v2(26.947,19.065)
  L1 (Sig) w0.6: v2@11.553,19.22 12.093,18.679 v2(12.968,18.679) ; v2(14.188,48.182) C5.1 v2(18.379,48.182) 18.429,48.232 19.512,48.232 U3.1 ; J1.A1 v2(18.871,15.108) ; v2(18.871,19.426) J1.A12 ; J1.B12 20.649,14.577 v2(20.649,15.108) ; v2(20.649,19.426) J1.B1@20.649,20.029 ; v2(28.829,22.098) A2.1 ; U3.40 37.167,48.377 v2(38.445,48.377) ; A2.10 40.398,13.335 v2(42.418,13.335) ; A2.12 40.365,15.494 v2(42.418,15.494) ; v2(47.879,11.811) A1.G@47.879,12.876 ; A1.G@47.879,15.826 v2(47.879,16.891) ; U3.41@25.512,43.122 v1(25.512,42.422) 25.512,41.722 v1(26.212,41.722) U3.41@26.912,41.722 ; U3.41@25.512,43.122 v1(25.512,43.822) 25.512,44.522 v1(26.212,44.522) U3.41@26.912,44.522 ; U3.41@25.512,43.122 U3.41@26.912,43.122 ; U3.41@26.912,41.722 U3.41@26.912,43.122 ; U3.41@26.912,41.722 v1(27.612,41.722) 28.312,41.722 v1(28.312,42.422) U3.41@28.312,43.122 ; U3.41@26.912,43.122 U3.41@26.912,44.522 ; U3.41@26.912,43.122 U3.41@28.312,43.122 ; U3.41@26.912,44.522 v1(27.612,44.522) 28.312,44.522 U3.41@28.312,43.122
  other v1: 46.482,11.811 47.117,11.811 48.641,11.811 49.276,11.811 43.434,13.335 44.45,13.335 45.466,13.335 43.434,15.367 45.466,15.367 21.904,15.869 46.482,16.891 47.117,16.891 48.641,16.891 49.276,16.891 17.332,17.012 17.316,17.753 16.316,18.155 21.904,18.189 23.824,21.577 25.729,21.577 19.079,26.905 19.079,27.836 23.205,40.122 22.894,41.019 28.312,43.822
  other v2: 11.505,19.172 8.208,40.572
GNSS_ON: A2.5 U3.34 | length 29.9
  L1 (Sig) w0.2: A2.5 31.361,17.698 41.656,27.993 41.656,36.568 37.462,40.762 U3.34
GNSS_RX: A2.3 U3.33 | length 26
  L1 (Sig) w0.2: A2.3 31.361,19.898 41.148,29.685 41.148,35.806 37.462,39.492 U3.33
GNSS_TX: A2.2 U3.32 | length 23.2
  L1 (Sig) w0.2: A2.2 31.361,20.998 40.64,30.277 40.64,35.044 37.462,38.222 U3.32
GPIO61: C12.2 J3.6 R5.1 S2.3 S2.4 U3.27 | length 61.7
  L1 (Sig) w0.102: J3.6 J3.6@46.176,31.115
  L1 (Sig) w0.2: S2.4 R5.1 12.446,48.514 13.208,49.276 20.955,49.276 22.098,48.133 32.131,48.133 35.687,44.577 35.687,32.639 36.229,32.097 36.937,32.097 U3.27 37.167,31.877 v1(38.608,31.877) ; J3.6@46.176,31.115 v1(46.863,31.115)
  L4 (Sig) w0.2: v1(38.608,31.877) 39.751,30.734 46.482,30.734 v1(46.863,31.115)
I2C_SCL: IC1.13 R7.1 U1.B1 U3.9 | length 35.2
  L1 (Sig) w0.2: R7.1 13.843,14.213 13.988,14.358 v1(13.988,14.917) 13.988,14.985 14.067,15.064 U1.B1 ; v1(14.986,30.734) v1(14.986,28.067) 14.986,27.095 15.34,26.741 IC1.13 ; v1(15.839,36.693) 17.368,38.222 U3.9
  L4 (Sig) w0.2: v1(13.988,14.917) 13.94,14.965 13.94,15.437 13.502,15.875 12.691,15.875 9.895,18.671 9.895,23.643 14.329,28.077 14.976,28.077 v1(14.986,28.067) ; v1(14.986,30.734) 14.986,35.84 v1(15.839,36.693)
I2C_SDA: IC1.14 R8.1 U1.C1 U3.8 | length 35.9
  L1 (Sig) w0.2: U1.C1 14.467,15.074 14.732,14.809 R8.1 ; v1(14.478,31.369) v1(14.478,27.432) 14.495,27.415 14.495,26.907 15.161,26.241 IC1.14 ; v1(15.077,36.693) 17.876,39.492 U3.8
  L4 (Sig) w0.2: v1(14.478,27.432) 10.351,23.304 10.351,18.834 12.801,16.383 13.589,16.383 14.731,15.241 14.731,14.936 v1(14.75,14.917) ; v1(14.478,31.369) 14.478,36.094 v1(15.077,36.693)
IMU_INT1: IC1.4 U3.15 | length 7.6
  L1 (Sig) w0.2: IC1.4 20.118,25.579 20.574,26.035 20.574,29.469 21.427,30.322 U3.15
IMU_INT2: IC1.9 U3.10 | length 13.3
  L1 (Sig) w0.2: v1(15.494,31.369) 17.555,29.308 IC1.9 ; v1(16.601,36.693) 16.669,36.693 16.928,36.952 U3.10
  L4 (Sig) w0.2: v1(15.494,31.369) 15.494,35.586 v1(16.601,36.693)
LCD_B0: J2.21 U3.42 | length 35.4
  L1 (Sig) w0.2: J2.21@7.076,31.574 10.095,31.574 10.31,31.359 v1(10.378,31.359) ; U3.42 29.715,45.725 29.715,46.479 v1(29.718,46.482)
  L4 (Sig) w0.2: v1(10.378,31.359) 10.378,37.455 21.945,49.022 27.178,49.022 v1(29.718,46.482)
LCD_B1: J2.22 U3.43 | length 34.9
  L1 (Sig) w0.2: J2.22@7.076,31.074 9.774,31.074 10.124,30.724 v1(10.886,30.724) ; v1@28.87,46.441 28.87,45.763 U3.43
  L4 (Sig) w0.2: v1(10.886,30.724) 10.886,37.328 22.199,48.641 26.67,48.641 v1@28.87,46.441
  other v1: 28.87,46.482
LCD_B2: J2.23 U3.44 | length 34
  L1 (Sig) w0.2: J2.23@7.076,30.574 9.639,30.574 9.964,30.249 11.083,30.249 11.394,30.56 v1(11.394,31.359) ; v1(28.067,46.482) 28.089,46.46 28.089,45.744 U3.44
  L4 (Sig) w0.2: v1(11.394,31.359) 11.394,37.201 22.453,48.26 26.289,48.26 v1(28.067,46.482)
LCD_B3: J2.24 U3.45 | length 33
  L1 (Sig) w0.2: J2.24@7.076,30.074 9.504,30.074 9.743,29.835 11.3,29.835 11.874,30.409 11.874,30.696 v1(11.902,30.724) ; v1(27.305,46.482) 27.308,46.479 27.308,45.725 U3.45
  L4 (Sig) w0.2: v1(11.902,30.724) 11.902,37.074 22.707,47.879 25.908,47.879 v1(27.305,46.482)
LCD_B4: J2.25 U3.46 | length 32.1
  L1 (Sig) w0.2: J2.25@7.076,29.574 9.369,29.574 9.534,29.409 11.476,29.409 12.41,30.343 v1(12.41,31.359) ; U3.46 26.527,45.738 26.527,46.466 v1(26.543,46.482)
  L4 (Sig) w0.2: v1(12.41,31.359) 12.41,36.947 22.961,47.498 25.527,47.498 v1(26.543,46.482)
LCD_B5: J2.26 U3.47 | length 31.1
  L1 (Sig) w0.2: J2.26 11.776,29.074 12.918,30.216 v1(12.918,30.724) ; v1(25.654,46.482) 25.683,46.453 25.683,45.751 U3.47
  L4 (Sig) w0.2: v1(12.918,30.724) 12.918,36.82 23.197,47.099 25.037,47.099 v1(25.654,46.482)
LCD_B6: J2.27 U3.48 | length 29.9
  L1 (Sig) w0.2: J2.27@7.076,28.574 11.911,28.574 13.426,30.089 v1(13.426,31.359) ; v1(24.892,46.482) 24.902,46.472 24.902,45.732 U3.48
  L4 (Sig) w0.2: v1(13.426,31.359) 13.426,36.693 23.283,46.55 24.65,46.55 24.67,46.53 24.844,46.53 v1(24.892,46.482)
LCD_B7: J2.28 U3.49 | length 28.1
  L1 (Sig) w0.2: J2.28@7.076,28.074 8.023,28.074 8.077,28.128 12.1,28.128 13.934,29.962 v1(13.934,30.724) ; v1(23.495,45.593) 23.563,45.593 23.692,45.722 U3.49
  L4 (Sig) w0.2: v1(13.934,30.724) 13.934,36.439 23.088,45.593 v1(23.495,45.593)
LCD_CLK: J2.30 U3.25 | length 38.1
  L1 (Sig) w0.2: J2.30@7.076,27.074 12.677,27.074 14.986,24.765 32.609,24.765 36.957,29.113 36.957,30.547 35.754,31.75 34.798,31.75 34.477,31.429 34.477,30.972 U3.25
LCD_G0: J2.13 U3.50 | length 22.3
  L1 (Sig) w0.2: J2.13 6.961,35.562 16.208,35.562 v1(16.22,35.55) ; v1(23.459,44.694) 23.473,44.708 24.298,44.708 U3.50
  L4 (Sig) w0.2: v1(16.22,35.55) 17.363,36.693 17.363,38.598 v1(23.459,44.694)
LCD_G1: J2.14 U3.51 | length 22.1
  L1 (Sig) w0.2: J2.14@7.076,35.074 16.565,35.074 16.787,35.296 v1(16.855,35.296) ; v1(23.459,43.932) 23.464,43.927 24.307,43.927 U3.51
  L4 (Sig) w0.2: v1(16.855,35.296) 17.871,36.312 17.871,38.344 v1(23.459,43.932)
LCD_G2: J2.15 U3.52 | length 22.4
  L1 (Sig) w0.2: J2.15@6.695,34.574 6.702,34.567 v1(16.595,34.567) ; v1(23.459,43.17) 23.483,43.146 24.288,43.146 U3.52
  L4 (Sig) w0.2: v1(16.595,34.567) 16.62,34.592 16.913,34.592 18.379,36.058 18.379,38.127 23.422,43.17 v1(23.459,43.17)
LCD_G3: J2.16 U3.53 | length 21.8
  L1 (Sig) w0.2: J2.16@7.076,34.074 17.216,34.074 17.422,34.28 v1(17.49,34.28) ; v1(23.459,42.281) 23.479,42.301 24.292,42.301 U3.53
  L4 (Sig) w0.2: v1(17.49,34.28) 18.887,35.677 18.887,37.709 v1(23.459,42.281)
LCD_G4: J2.17 U3.13 | length 12.9
  L1 (Sig) w0.2: J2.17@7.076,33.574 17.053,33.574 17.617,33.01 19.53,33.01 U3.13
LCD_G5: J2.18 U3.14 | length 13.1
  L1 (Sig) w0.2: J2.18@7.076,33.074 16.791,33.074 17.993,31.872 U3.14
LCD_G6: J2.19 U3.12 | length 13.6
  L1 (Sig) w0.2: J2.19 16.334,32.574 16.406,32.502 v1(16.474,32.502) ; v1(18.379,34.28) 19.53,34.28 U3.12
  L4 (Sig) w0.2: v1(16.474,32.502) 16.522,32.55 16.704,32.55 18.379,34.225 v1(18.379,34.28)
LCD_G7: J2.20 U3.21 | length 24.2
  L1 (Sig) w0.2: J2.20@7.076,32.074 16.013,32.074 17.363,30.724 19.999,30.724 21.777,32.502 27.467,32.502 29.047,30.922 U3.21
LCD_HE: J2.34 U3.29 | length 43.6
  L1 (Sig) w0.173: J2.34@7.076,25.074 12.772,25.074 14.351,23.495 33.248,23.495 40.132,30.379 v1(40.132,34.417) ; U3.29 37.167,34.417 v1(38.608,34.417)
  L4 (Sig) w0.173: v1(38.608,34.417) v1(40.132,34.417)
LCD_HS: J2.32 U3.30 | length 41.9
  L1 (Sig) w0.2: J2.32@7.076,26.074 13.042,26.074 14.779,24.337 32.809,24.337 39.21,30.738 39.21,34.684 38.212,35.682 U3.30
LCD_R0: J2.5 U3.22 | length 38.5
  L1 (Sig) w0.2: J2.5 6.969,39.594 10.358,39.594 v1(10.378,39.614) ; v1(21.046,33.01) 28.229,33.01 30.317,30.922 U3.22
  L4 (Sig) w0.2: v1(10.378,39.614) 9.997,39.614 8.727,38.344 8.727,30.47 10.124,29.073 17.109,29.073 v1(21.046,33.01)
LCD_R1: J2.6 U3.23 | length 39.6
  L1 (Sig) w0.2: J2.6 6.965,39.09 10.87,39.09 v1(10.886,39.106) ; v1(21.046,33.772) 28.737,33.772 31.587,30.922 U3.23
  L4 (Sig) w0.2: v1(10.886,39.106) 10.214,39.106 9.159,38.05 9.159,30.74 10.358,29.541 16.815,29.541 v1(21.046,33.772)
LCD_R2: J2.7 U3.24 | length 38.7
  L1 (Sig) w0.2: J2.7 6.961,38.586 10.366,38.586 v1(10.378,38.598) ; v1(21.046,34.534) 29.245,34.534 32.857,30.922 U3.24
  L4 (Sig) w0.2: v1(10.378,38.598) 9.616,37.836 9.616,30.978 10.632,29.962 16.474,29.962 v1(21.046,34.534)
LCD_R3: J2.8 U3.4 | length 15.3
  L1 (Sig) w0.2: J2.8@7.076,38.074 12.267,38.074 18.729,44.536 19.626,44.536 U3.4
LCD_R4: J2.9 U3.5 | length 15
  L1 (Sig) w0.2: J2.9@7.076,37.574 12.529,37.574 18.257,43.302 U3.5
LCD_R5: J2.10 U3.6 | length 14.6
  L1 (Sig) w0.2: J2.10@7.076,37.074 12.717,37.074 17.675,42.032 U3.6
LCD_R6: J2.11 U3.7 | length 14.3
  L1 (Sig) w0.2: J2.11@7.076,36.574 12.926,36.574 17.114,40.762 U3.7
LCD_R7: J2.12 U3.11 | length 12.7
  L1 (Sig) w0.2: J2.12@7.076,36.074 17.22,36.074 17.49,35.804 19.54,35.804 U3.11
LCD_VS: J2.33 U3.31 | length 43.6
  L1 (Sig) w0.2: J2.33@7.076,25.574 12.907,25.574 14.549,23.932 33.094,23.932 39.624,30.462 39.624,34.79 37.462,36.952 U3.31
SW: L1.1 U2.B2 | length 1.6
  L1 (Sig) w0.183: U2.B2 14.067,19.14
  L1 (Sig) w0.314: 14.067,19.14 14.067,19.323 14.339,19.595
  L1 (Sig) w0.6: 14.339,19.595 L1.1@14.918,20.174
SW1: C13.2 R6.1 S3.3 S3.4 U3.39 | length 10.3
  L1 (Sig) w0.2: U3.39 43.801,47.112 44.473,46.441 S3.3 44.704,46.409 R6.1 ; C13.2 48.768,46.386 S3.4
SYS: C2.2 U1.B2 U2.B1 U2.C2 | length 3
  L1 (Sig) w0.109: U2.B1 U2.C2
  L1 (Sig) w0.23: U1.B2 14.067,16.228
  L1 (Sig) w0.314: 14.067,16.228 C2.2 U2.B1
TS/MR: U1.D1 | length 0.6
  L1 (Sig) w0.2: U1.D1 14.875,15.603 15.132,15.346 15.337,15.346 v1(15.385,15.298)
USB_CC1: J1.A5 R3.2 | length 2.7
  L1 (Sig) w0.2: R3.2 16.36,16.848 16.435,16.773 16.48,16.773 16.77,16.483 18.826,16.483 J1.A5
USB_CC2: J1.B5 R2.2 | length 7.3
  L1 (Sig) w0.2: R2.2 16.37,19.425 16.57,19.425 16.748,19.248 16.748,19.061 17.078,18.731 v1(17.078,18.663) ; J1.B5 20.651,18.079 21.151,18.079 21.364,18.292 21.364,18.615 v1(21.411,18.663)
  L4 (Sig) w0.2: v1(17.078,18.663) 17.709,18.033 18.155,18.033 18.16,18.028 20.776,18.028 v1(21.411,18.663)
USB_D_N: D1.4 U3.54 | length 23.3
  L1 (Sig) w0.173: v1(23.459,41.519) 23.46,41.52 24.311,41.52 U3.54 ; v1(25.094,21.585) 25.094,21.229 25.738,20.586 D1.4
  L4 (Sig) w0.173: v1(23.459,41.519) 23.504,41.519 23.699,41.324 24.097,41.324 24.963,40.458 24.963,21.791 25.094,21.66 v1(25.094,21.585)
USB_D_P: D1.6 U3.55 | length 22.7
  L1 (Sig) w0.173: v1(23.459,40.757) 23.477,40.739 24.295,40.739 U3.55 ; D1.6 23.838,20.586 24.479,21.226 24.479,21.566 v1(24.459,21.585)
  L4 (Sig) w0.173: v1(23.459,40.757) 23.504,40.757 23.699,40.952 23.943,40.952 24.591,40.304 24.591,21.791 24.459,21.66 v1(24.459,21.585)
USBD_N: D1.3 J1.A7 J1.B7 | length 13.1
  L1 (Sig) w0.173: v1(17.958,17.558) 18.034,17.558 18.126,17.465 18.808,17.465 J1.A7 ; J1.B7 20.665,17.093 21.389,17.093 21.85,16.631 21.98,16.631 22.111,16.762 22.121,16.762 22.488,16.762 23.123,16.127 24.303,16.127 24.974,16.799 24.974,16.922 D1.3@25.738,17.686
  L4 (Sig) w0.173: v1(17.958,17.558) 18.034,17.558 18.147,17.444 18.949,17.444 19.232,17.727 22.096,17.727 22.366,17.457 22.366,17.075 21.922,16.631 v1(21.904,16.631)
USBD_P: D1.1 J1.A6 J1.B6 | length 11
  L1 (Sig) w0.173: v1(17.958,16.958) 18.034,16.958 18.168,17.093 18.808,17.093 J1.A6 ; J1.B6 20.665,17.465 21.543,17.465 21.689,17.319 21.851,17.319 v1(21.904,17.266) 21.98,17.266 22.111,17.135 22.121,17.135 22.642,17.135 23.277,16.5 24.148,16.5 24.514,16.866 24.514,17.009 23.838,17.686 D1.1
  L4 (Sig) w0.173: v1(17.958,16.958) 18.034,16.958 18.147,17.072 19.103,17.072 19.386,17.355 21.665,17.355 21.7,17.319 21.851,17.319 v1(21.904,17.266)
VCC_RF: A2.14 L2.1 | length 5
  L1 (Sig) w0.3: A2.14 41.894,17.698 44.293,15.299 L2.1
VLED+: J2.2
VLED-: J2.1
VSEL: R1.2 U2.C1 | length 1.2
  L1 (Sig) w0.183: U2.C1 U2.C1@14.426,18.544
  L1 (Sig) w0.2: U2.C1@14.426,18.544 14.671,18.298 R1.2
VUSB: C1.2 D1.5 J1.A4 J1.A9 J1.B4 J1.B9 U1.A2 | length 24.8
  L1 (Sig) w0.367: 13.409,16.053 13.459,16.003 U1.A2
  L1 (Sig) w0.497: v2(12.192,14.859) 12.199,14.866 12.199,15.994 C1.2@12.226,16.021 ; C1.2 C1.2@12.226,16.021 ; 13.378,16.021 C1.2@12.226,16.021 ; v2@16.78,15.471 16.78,15.509 17.3,16.029 J1.A4 19.737,16.029 ; J1.A9 18.884,18.542 19.724,18.542 v2(19.737,18.555) ; J1.B9 19.737,16.029 ; J1.B4 19.736,18.529 19.737,16.029 ; v2(22.793,19.171) 24.424,19.171 24.737,19.483 24.737,20.234 D1.5
  L4 (Sig) w0.497: v2(12.192,14.859) 12.22,14.859 12.785,14.294 15.537,14.294 v2(16.747,15.504) ; v2(19.737,18.555) 19.756,18.575 19.756,19.488 20.972,20.704 22.259,20.704 22.786,20.177 22.786,19.178 v2(22.793,19.171)
pads on no net: A2.4 A2.7 A2.9 A2.13 A2.15 A2.16 A2.17 A2.18 IC1.2 IC1.3 IC1.10 IC1.11 J1. J1.A8 J1.B8 J2.35 J2.37 J2.38 J2.39 J2.40 J3. U3.17 U3.18 U3.19 U3.20 U3.26 U3.28 U3.35 U3.38 U3.56 U3.57 U3.58 U3.59 U3.60 U3.61

## Polygon pours and split planes (outlines as drawn)
GND on L1 (Sig) "GND_L01_P001" (solid, pour order 1): 49.276,13.081 49.657,12.7 49.657,11.43 46.101,11.43 46.101,12.7 46.482,13.081
GND on L1 (Sig) "GND_L01_P000" (solid, pour order 0): 46.482,15.621 46.101,16.002 46.101,17.272 49.657,17.272 49.657,16.002 49.276,15.621

## Text inside footprints (layer, text, board x,y; h text height)
U3: Mechanical 13 "Antenna" at 23.864,52.012 h1.52